# Altium PCB BUCK-BOOST_PWM_Controller.PcbDoc (part 2 of 2)
Units mil, origin at the board's own origin, x right, y up, seen from the top; angles counter-clockwise.
Board outline 3547.43 x 2765.94 mil, 2 copper layers (Top Layer, Bottom Layer); 199 components, 100 nets, 475 pads, 71 vias.
Unrouted connection lines stored in the file: 456.
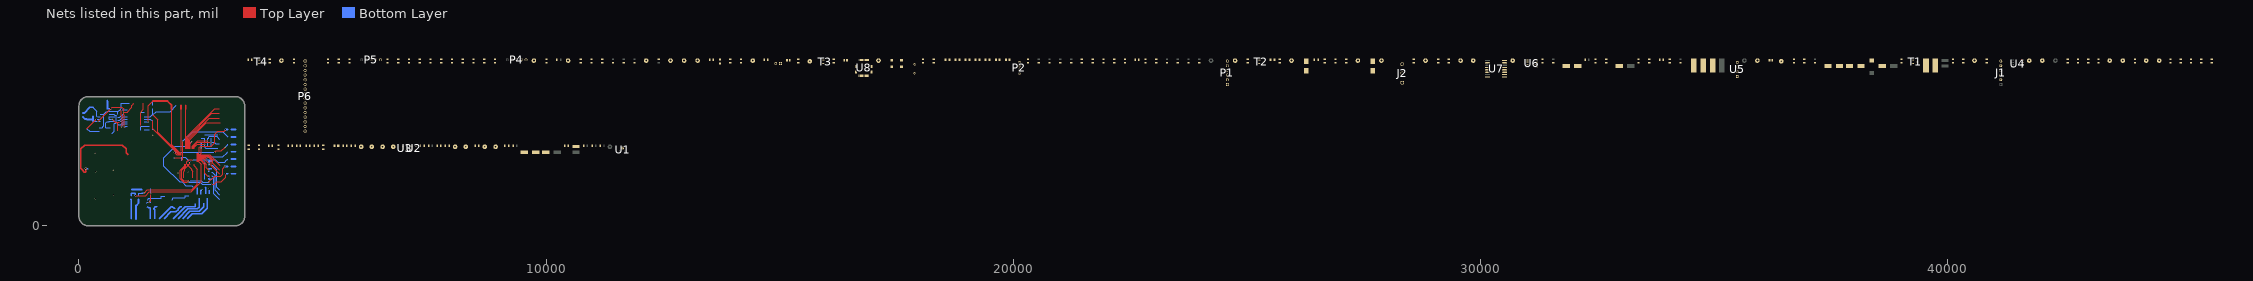
[diagram p2: the nets of this part, all layers, seen from the top]

## Via types
v1: diameter 31.5, hole 15.75, Top Layer to Bottom Layer, tented both sides, 63 vias
v2: diameter 50, hole 28, Top Layer to Bottom Layer, 8 vias

## Nets (pads, with @x,y where several pads share a name; then routed paths per layer and width w, separated by ;. In a path a pad name is that pad's centre, name@x,y a point inside that pad or via, vN(x,y) a via of type N, cw(c..) or ccw(c..) an arc to the next point about the centre after c; other vN are vias at no path point) (continued)
+5V_ISO: C27.1 R20.2 R22.2 R23.2 TP18.1 U5.4 U6.8 U7.10 U7.16 | length 1902.1
  Top Layer w19.68: v1(901.57,2124.02) 932.09,2154.53 932.09,2342.52 908.46,2366.14 908.46,2483.27 v1(909.45,2484.25)
  Bottom Layer w19.68: 430.13,2103.35 500.98,2103.35 506.89,2109.26 506.89,2120.08 529.53,2142.72 529.53,2387.8 ; 454.13,2383.07 524.8,2383.07 529.53,2387.8 ; 609.25,2438.98 580.71,2438.98 529.53,2387.8 ; 609.25,2446.85 836.61,2446.85 844.49,2446.85 ; 836.61,2385.82 836.61,2438.98 844.49,2446.85 ; v1@903.83,2121.76 v1(901.57,2124.02) 902.47,2124.02 960.54,2182.09 1037.4,2182.09 ; 1037.4,2482.09 911.61,2482.09 v1(909.45,2484.25) ; 1077.36,2618.11 909.45,2618.11 v1(909.45,2484.25) ; 844.49,2446.85 879.92,2482.28 907.48,2482.28 v1(909.45,2484.25)
+5V_OUT: C31.2 C33.1 L5.2 P2.1 R2.2 R25.2 R36.2 R68.2 U5.2
+5VDC: C20.2 C23.1 C28.2 C30.2 L2.1 L4.1 L5.1 P6.1 TP16.1 | length 310.4
  Bottom Layer w31.5: 1604.33,374.01 1604.33,365.15 1621.06,348.42 1621.06,156.33 1628.06,149.34 ; 1607.44,382.87 1636.69,412.12 1665.23,412.12 1669.45,416.34
GND_2: C27.2 J2.2 R29.1 R32.1 TP27.1 U5.3 U6.5 U7.9 U7.15 ZD1.1 ZD2.1 | length 2511.6
  Top Layer w19.68: v1(409.45,2233.07) 710.83,2534.45 922.24,2534.45 954.72,2501.97 v1(954.72,2433.07) ; v1(968.5,2109.25) 968.66,2109.41 968.66,2368.6 954.72,2382.53 v1(954.72,2433.07) ; 1151.34,2592.09 1177.36,2618.11 ; 1151.34,2595.55 1135.83,2580.03 1135.83,2538.39 1032.77,2435.33 956.98,2435.33 v1(954.72,2433.07)
  Bottom Layer w19.68: 77.76,2328.74 86.62,2328.74 ; 160.34,2287.51 171.26,2276.58 ; 300.2,2238.19 305.31,2233.07 v1(409.45,2233.07) 454.13,2233.07 ; 836.61,2318.9 874.01,2318.9 954.72,2399.62 v1(954.72,2433.07) 955.22,2432.58 1036.91,2432.58 1037.4,2432.09 ; v1(968.5,2109.25) 970.76,2111.51 977.29,2111.51 997.87,2132.09 1037.4,2132.09
  Bottom Layer w39.37: 86.62,2328.74 127.85,2287.51 160.34,2287.51 ; 171.26,2276.58 300.2,2276.58 ; 300.2,2238.19 300.2,2276.58 ; 300.2,2345.24 300.2,2292.32 300.2,2276.58 ; 608.27,2683.07 608.27,2666.34 608.76,2665.85 608.76,2506.4 609.25,2505.91 609.74,2506.4 681.59,2506.4 v1(682.09,2506.89)
GND_III: C1.1 C2.1 C3.2 C4.2 C5.1 C7.1 C9.1 C12.1 C13.1 C14.1 C15.1 C16.1 C17.1 C20.1 C21.2 C22.2 C23.2 C24.2 C25.1 C26.1 C28.1 C29.1 C30.1 C31.1 C32.2 C33.2 C34.1 C35.1 C36.1 C37.1 C38.1 C39.2 C40.2 C41.1 C42.1 C43.1 C44.1 C45.1 C46.1 C47.1 C48.1 C49.1 D1.2 D2.2 D3.2 D4.2 D5.2 D6.2 D7.2 D8.2 D9.2 J1.6 P1.1 P2.4 P3.2 P4.5 P5.5 P6.10 R12.2 R13.2 R14.1 R15.1 R19.1 R31.1 R34.1 R50.1 R51.1 R63.1 R64.1 R65.1 R66.1 R67.1 R71.1 T1.2 T2.2 T3.2 T4.2 TP30.1 TP39.1 U2.2 U3.2 U4.4 U5.1 U7.2 U7.8 U8.8 U8.23 U8.35 U8.47 VD1.1 VD2.1 | length 3990.8
  Top Layer w10: v1(1319.88,2133.86) v1@1320.23,2134.21
  Top Layer w11.81: 2386.81,1319.88 2386.91,1319.98
  Top Layer w19.68: v1@1320.23,2134.21 1319.88,2134.56 v1(1319.88,2434.06) 1377.36,2491.54 1377.36,2618.11 ; v1(1501.14,502.95) 1538.54,540.35 v1(1538.54,682.09)
  Bottom Layer w10: v1(1319.88,2133.86) v1@1320.77,2132.97 ; 1399.61,2430.12 1401.57,2432.09 ; 1400.69,2132.97 1401.57,2132.09 ; 1501.77,2132.09 1501.97,2131.88
  Bottom Layer w19.68: 1316.93,2060.04 1318.41,2061.52 1318.41,2132.38 v1(1319.88,2133.86) ; v1(1319.88,2434.06) 1320.87,2433.07 1396.65,2433.07 1399.61,2430.12 ; v1@1320.77,2132.97 1400.69,2132.97 ; 1401.57,2132.09 1501.77,2132.09 ; 1451.78,488.19 1466.54,502.95 v1(1501.14,502.95) 1523.77,502.95 1529.68,497.05 ; 1464.73,558.07 1473.58,558.07 1479.49,563.98 1479.49,583.94 1491.02,595.47 1757.04,595.47 1766.89,605.32 1766.89,635.83 1767.88,636.81 1839.71,636.81 ; 1529.68,494.09 1529.68,497.05 ; 1538.54,561.02 1532.63,555.12 1529.68,555.12 1529.68,497.05 ; v1(1538.54,682.09) 1538.54,718.5 ; 1539.52,718.5 1539.52,788.38 ; 1989.33,558.07 1997.62,558.07 2003.53,563.98 2003.53,586.62 2015.06,598.15 2151.57,598.15 2261.39,598.15 2272.92,609.68 2272.92,634.84 2278.83,640.75 2284.59,640.75 ; 2292.48,640.75 2353.51,640.75 2354.49,639.76 ; 2690.94,1950.79 2693.01,1952.85 2973.33,1952.85 ; 2696.85,1363.18 2707.68,1374.01 ; 2698.08,999.01 2698.08,1370.08 ; 3003.84,1951.87 3005.91,1953.94
  Bottom Layer w31.5: 1459.65,409.45 1464.73,409.45 1491.31,382.87 1525.59,382.87 1525.59,374.01 ; 1521.65,154.33 1521.65,358.11 1522.87,359.33 1522.87,366.79 ; 1721.65,154.33 1978.74,411.42 ; 1978.74,410.43 2001.36,410.43 2040.73,371.06 2048.38,371.06 2048.38,363.41 ; 2609.25,680.12 2609.25,756.89 v1(2644.68,756.89) ; 2788.39,682.09 2788.39,749.02 2790.35,750.99 2790.35,757.88
  Bottom Layer w39.37: 1138.77,774.61 1139.27,775.1 1343.98,775.1 1344.48,775.59
  other v1: 351.38,580.71 740.16,665.35 2791.34,805.12 2121.06,1138.78 2340.55,1145.67 359.1,1158.46 732.28,1193.9 353.35,1557.09 1581.69,1940.94
NetC3_1: C3.1 C7.2 L1.1 U1.2 | length 1874.7
  Top Layer w31.5: 138.93,1147.64 119.09,1147.64 93.5,1173.23 93.5,1178.15 41.34,1230.31 41.34,1647.64 122.05,1728.35 929.13,1728.35 1008.86,1648.62 1008.86,1560.04 1052.17,1516.73 ; v2(147.49,1225.39) 147.49,1158.62 156.5,1149.61
  Bottom Layer w31.5: v2(147.49,1225.39) 151.03,1221.85 189.96,1221.85 192.91,1218.9 192.91,1207.68
NetC6_1: C6.1 C18.1 R9.2 R16.1 TP11.1 U2.4
NetC6_2: C6.2 C16.2 R3.2 R14.2 TP3.1 U2.3
NetC8_1: C8.1 C19.1 R10.2 R17.1 TP13.1 U3.4
NetC8_2: C8.2 C17.2 R4.2 R15.2 TP5.1 U3.3
NetC10_1: C10.1 P6.8 R9.1 TP10.1
NetC10_2: C10.2 P6.9 R3.1 TP2.1
NetC11_1: C11.1 P6.6 R10.1 TP12.1
NetC11_2: C11.2 P6.7 R4.1 TP4.1
NetC12_2: C12.2 R5.1 R6.2
NetC13_2: C13.2 R6.1 R12.1 TP6.1 U8.10
NetC14_2: C14.2 R7.1 R8.2
NetC15_2: C15.2 R8.1 R13.1 TP8.1 U8.11
NetC18_2: C18.2 R5.2 R16.2 TP7.1 U2.1
NetC19_2: C19.2 R7.2 R17.2 TP9.1 U3.1
NetC24_1: C24.1 C26.2 L2.2 TP14.1 U4.8 | length 492.8
  Bottom Layer w31.5: 1821.65,154.33 1964.57,297.24 2075.79,297.24 2127.12,348.58 2127.12,362.2 2127.12,371.06 2135.98,371.06 2173.39,408.46 2196.03,408.46
NetC39_1: C39.1 U8.5 Y1.2 | length 325.7
  Top Layer w11.81: 2242.52,1029.53 2242.52,1159.93 2255.73,1173.14 2255.73,1179.13 2268.68,1192.08 2268.68,1204.97 ; 2268.7,1204.99 2268.7,1221.46 2327.76,1280.51 2327.76,1319.88
NetC40_1: C40.1 U8.6 Y1.1 | length 326.5
  Top Layer w11.81: 2347.44,1319.88 2347.54,1319.79 2347.54,1279.43 2412.4,1214.57 2412.4,1192.91 2434.65,1170.67 2434.65,1029.53
NetC41_2: C41.2 R35.1 U8.7 | length 326.4
  Top Layer w11.81: 2367.13,1319.88 v1(2367.13,1373.03)
  Bottom Layer w19.68: 2203.73,1390.75 2203.73,1463.59 ; 2206.69,1469.49 2270.67,1469.49 v1(2367.13,1373.03)
NetC42_2: C42.2 R60.2 R63.2 TP37.1 U8.13 | length 2210.2
  Top Layer w11.81: v1(1207.68,646.65) 1429.13,646.65 1508.86,726.38 2406.5,726.38 2620.08,939.96 2620.08,1316.93 2558.07,1378.94 2524.61,1378.94
  Bottom Layer w31.5: v1(1207.68,646.65) 1207.68,695.85
  Bottom Layer w39.37: 1120.09,645.67 1120.09,693.91 ; 1122.04,695.87 1202.74,695.87
NetC43_2: C43.2 R52.2 R64.2 TP33.1 U8.12 | length 1851.6
  Top Layer w11.81: v1(1393.7,695.87) 1466.54,768.7 2416.34,768.7 2537.4,889.76 2537.4,1213.5 2465.55,1285.35 2465.55,1319.88
  Bottom Layer w19.68: 1275.59,647.64 1275.59,696.84 1344.48,696.85
  Bottom Layer w31.5: 1344.48,696.85 1392.72,696.85 v1(1393.7,695.87)
NetC44_2: C44.2 R62.2 R67.2 TP36.1 U8.16 | length 440.4
  Top Layer w11.81: 2524.61,1437.99 2677.17,1437.99 v1(2784.45,1330.71)
  Bottom Layer w31.5: 2779.77,1304.13 2784.45,1308.81 2784.45,1345.62 2780.51,1349.56 2780.51,1375 2784.45,1378.94 2840.56,1378.94
NetC45_2: C45.2 R58.2 R65.2 TP35.1 U8.15 | length 526.5
  Top Layer w11.81: 2524.61,1418.31 2622.05,1418.31 2724.41,1315.95 2724.41,1244.09 v1(2781.5,1187.01)
  Bottom Layer w31.5: 2777.8,1152.56 2778.3,1153.05 2778.3,1221.95 2778.79,1222.44 2782.73,1226.38 2838.59,1226.38
NetC46_2: C46.2 R53.2 R66.2 TP31.1 U8.14 | length 648.5
  Top Layer w11.81: 2524.61,1398.62 2606.3,1398.62 2693.9,1311.02 2693.9,1121.06 v1(2778.54,1036.42)
  Bottom Layer w31.5: 2777.8,1068.89 2777.31,1068.4 2777.31,999.5 2776.82,999.01 2779.77,996.06 2838.58,996.06
NetC47_2: C47.2 P4.4 R55.1 U8.27 | length 910.9
  Top Layer w11.81: 2426.18,1654.53 2426.18,1706.69 2539.37,1819.88 v1(2761.81,1819.88)
  Bottom Layer w19.68: 2758.85,1694.88 2760.33,1696.36 2760.33,1818.4 v1(2761.81,1819.88) 2761.81,1869.09 2762.79,1870.08 ; 2761.8,1871.06 2768.83,1871.06 2774.74,1876.97 2774.74,1900.87 2786.27,1912.4 2947.44,1912.4 3005.91,1853.94
NetC48_2: C48.2 P4.3 R56.1 U8.26 | length 827.3
  Top Layer w11.81: 2445.87,1654.53 2445.87,1694.88 2534.45,1783.46 v1(2829.72,1783.46)
  Bottom Layer w19.68: 2827.75,1694.88 2828.74,1695.87 2828.74,1782.48 v1(2829.72,1783.46) ; 2829.72,1872.04 v1(2829.72,1783.46) ; 3005.91,1753.94 2931.1,1753.94 2901.57,1783.46 v1(2829.72,1783.46)
NetC49_2: C49.2 P4.2 R57.1 R59.1 U8.25 | length 844.9
  Top Layer w11.81: 2465.55,1654.53 2465.65,1654.62 2465.65,1685.13 2530.51,1750 v1(2689.96,1750)
  Bottom Layer w19.68: 2619.1,1871.06 2619.59,1871.56 2690.45,1871.56 2690.94,1872.05 ; 2689.95,1694.88 2698.36,1694.88 2704.27,1688.98 2704.27,1666.45 2715.8,1654.92 2975.39,1654.92 ; 2689.96,1871.07 2690.45,1870.58 2690.45,1750.49 v1(2689.96,1750) 2689.96,1700.79 2694.88,1700.79
NetD1_1: D1.1 R1.1
NetD2_1: D2.1 R30.1 | length 101.8
  Bottom Layer w11.81: 1500.01,2060.04 1500.98,2061.02
  Bottom Layer w19.68: 1399.61,2060.04 1500.01,2060.04
NetD3_1: D3.1 R40.1 | length 96.5
  Bottom Layer w39.37: 3260.83,1586.61 3357.28,1586.61
NetD4_1: D4.1 R41.1 | length 96.5
  Bottom Layer w39.37: 3260.83,1744.09 3357.28,1744.09
NetD5_1: D5.1 R37.1 | length 96.5
  Bottom Layer w39.37: 3260.83,1114.17 3357.28,1114.17
NetD6_1: D6.1 R38.1 | length 96.5
  Bottom Layer w39.37: 3260.83,1271.65 3357.28,1271.65
NetD7_1: D7.1 R39.1 | length 96.5
  Bottom Layer w39.37: 3260.83,1429.13 3357.28,1429.13
NetD8_1: D8.1 R42.1 | length 96.5
  Bottom Layer w39.37: 3260.83,1901.57 3357.28,1901.57
NetD9_1: D9.1 R43.1 | length 96.5
  Bottom Layer w39.37: 3260.83,2059.06 3357.28,2059.06
NetD10_1: D10.1 R61.1
NetD10_2: D10.2 P3.1 R54.2 TP34.1 U8.28
NetJ1_2: J1.2 U8.34 | length 925.8
  Top Layer w11.81: 2286.81,2494.69 2286.81,1677.25 2288.29,1675.77 2288.29,1654.62 2288.39,1654.53
  Top Layer w39.37: 2286.81,2494.69 2286.81,2579.72
NetJ1_3: J1.3 U8.37 | length 987.3
  Top Layer w11.81: 2186.81,2495.87 2186.81,1595.57 2186.91,1595.47 2189.96,1595.47
  Top Layer w39.37: 2186.81,2495.87 2186.81,2579.72
NetJ1_4: J1.4 R24.1 TP22.1 U7.4 U8.39 | length 2021.4
  Top Layer w11.81: 1582.68,2374.02 1684.06,2272.64 1684.06,2006.89 2134.84,1556.1 2189.96,1556.1
  Bottom Layer w19.68: 1401.57,2332.09 1531.78,2332.09 1573.7,2374.02 1582.68,2374.02 ; 1582.68,2505.9 1582.68,2374.02 ; 2086.81,2579.72 1950,2442.91 1651.57,2442.91 1582.68,2374.02
NetJ1_5: J1.5 R21.1 TP24.1 U7.6 U8.38 | length 2287.9
  Top Layer w11.81: 1985.24,2579.72 1985.24,1740.16 2149.61,1575.79 2189.96,1575.79
  Top Layer w19.68: v1(1482.28,2232.28) 1482.28,2567.91 1585.63,2671.26
  Top Layer w39.37: 1585.63,2671.26 1895.28,2671.26 1986.81,2579.72 ; 1985.25,2497.05 1985.25,2576.15
  Bottom Layer w15.75: 1401.57,2232.09 1401.67,2232.19 1482.19,2232.19 v1(1482.28,2232.28) ; 1584.65,2577.75 1585.14,2578.24 ; 1585.14,2670.77 1585.63,2671.26
  Bottom Layer w19.68: 1400.98,2232.68 1401.57,2232.09 ; 1585.14,2578.24 1585.14,2670.77
NetJ2_1: J2.1 R32.2 U6.7 ZD2.2 | length 575.9
  Bottom Layer w19.68: 77.76,2407.48 83.67,2413.39 ; 299.93,2537.13 300.2,2537.4 385.83,2451.77 385.83,2347.44 399.61,2333.66 453.54,2333.66 454.13,2333.07
  Bottom Layer w39.37: 83.67,2413.39 111.21,2413.39 234.96,2537.13 299.93,2537.13
NetJ2_3: J2.3 R20.1 U6.6 ZD1.2 | length 650.6
  Top Layer w19.68: 171.26,2079.73 172.25,2079.73 374.01,2281.5 v1(375,2281.5)
  Bottom Layer w19.68: 171.26,2079.73 228.59,2022.4 299.21,2022.4 301.42,2024.61 430.12,2024.61 ; v1(375,2281.5) 375.98,2282.48 453.54,2282.48 454.13,2283.07
NetP1_2: P1.2 U8.31 | length 1052.5
  Top Layer w11.81: 2347.44,1654.53 2347.44,1868.11 2785.43,2306.1 3004.92,2306.1
NetP1_3: P1.3 U8.33 | length 1197.8
  Top Layer w11.81: 2308.07,1654.53 2308.07,1907.48 2906.53,2505.93 3004.75,2505.93 3004.92,2506.1
NetP1_4: P1.4 U8.19 | length 645.2
  Top Layer w11.81: 2524.61,1497.05 2781.5,1497.05 2869.09,1409.45 2869.09,1342.52 3008.73,1202.88
NetP1_5: P1.5 U8.20 | length 585.6
  Top Layer w11.81: 2524.61,1516.73 2797.24,1516.73 3018.51,1295.47
NetP1_6: P1.6 U8.42
NetP2_2: P2.2 R47.2
NetP2_3: P2.3 R48.2
NetP5_2: P5.2 R53.1 | length 581.5
  Bottom Layer w19.68: 2838.58,1074.8 2847.43,1074.8 2884.84,1037.39 2884.84,690.54 3007.07,568.31
NetP5_3: P5.3 R58.1 | length 555.5
  Bottom Layer w19.68: 2838.59,1147.64 2844.49,1141.73 2855.32,1141.73 2918.31,1078.74 2918.31,757.07 3007.07,668.31
NetP5_4: P5.4 R62.1 | length 615.1
  Bottom Layer w19.68: 2833.93,1294.29 2839.84,1300.2 2840.56,1300.2 2849.42,1300.2 2948.82,1200.79 2948.82,826.56 3007.07,768.31
NetP6_2: P6.2 R60.1 | length 417.1
  Bottom Layer w39.37: 1113.17,560.01 1120.09,566.93 ; 1121.65,154.33 1121.65,561.64
NetP6_3: P6.3 R52.1 | length 448
  Bottom Layer w39.37: 1223.43,142.51 1223.43,434.06 1275.6,486.23 1275.6,568.9
NetP6_4: P6.4 R68.1 R69.2
NetP6_5: P6.5 R69.1 T4.3
NetP6_11: P6.11 R25.1 R28.2 | length 644.8
  Bottom Layer w31.5: 2021.65,154.33 2273.83,406.5 2492.13,406.5 2492.13,424.22 2492.13,476.38
NetP6_12: P6.12 R28.1 T2.3 | length 738.6
  Bottom Layer w31.5: 2121.65,154.33 2327.56,360.24 2530.51,360.24 2571.85,401.57 2571.85,587.6
NetP6_13: P6.13 R2.1 R11.2 | length 625.2
  Bottom Layer w31.5: 2221.65,154.33 2377.36,310.04 2572.83,310.04 2672.24,409.46 2672.24,418.31 2672.24,478.34
NetP6_14: P6.14 R11.1 T1.3 | length 731.8
  Bottom Layer w31.5: 2321.65,154.33 2427.17,259.84 2629.92,259.84 2750.98,380.91 2750.98,418.31 2750.98,589.57
NetP6_15: P6.15 R36.1 R46.2
NetP6_16: P6.16 R46.1 T3.3
NetR18_1: R18.1 U8.32 | length 1124.9
  Top Layer w11.81: 2327.76,1654.53 2327.76,1887.8 2845.47,2405.51 3004.92,2405.51
NetR18_2: R18.2 R19.2 T1.1 TP17.1 | length 150.5
  Bottom Layer w31.5: 2707.68,830.7 2707.68,821.84 2709.42,819.44 2710.63,812.01 2710.63,748.04 2713.58,745.09 2713.58,712.6 2713.58,682.09
NetR22_1: R22.1 R26.1 TP20.1 U6.4 | length 399.2
  Bottom Layer w19.68: 675.2,2104.33 674.71,2103.84 580.21,2103.84 579.72,2103.35 579.72,2200.79 611.42,2232.48 647.64,2232.48 648.23,2233.07 740.44,2233.07 740.63,2233.26 751.97,2233.26 757.87,2239.17 757.87,2250.98
NetR23_1: R23.1 R27.1 TP25.1 U6.1 | length 602.3
  Bottom Layer w15.75: 710.63,1973.43 710.63,1981.94 ; 757.87,2177.16 757.87,2185.34 765.75,2193.22 789,2193.22 798.23,2202.44 798.23,2360.54 789,2369.76 765.75,2369.76 757.87,2377.64 757.87,2385.82
  Bottom Layer w19.68: 648.23,2383.07 757.87,2383.07 ; 710.63,1981.94 757.87,2029.18 757.87,2177.16
NetR26_2: R26.2 U7.13 | length 232.3
  Bottom Layer w19.68: 836.61,2255.91 842.52,2261.81 876.97,2261.81 947.24,2332.09 1037.4,2332.09
NetR27_2: R27.2 U7.11 | length 233.4
  Bottom Layer w19.68: 836.61,2177.16 836.61,2173.66 842.52,2167.75 898.06,2167.75 962.4,2232.09 1037.4,2232.09
NetR29_2: R29.2 TP23.1 U6.2 U6.3 U7.12 | length 795.5
  Top Layer w19.68: v1(709.04,2284.05) 780.5,2212.59 835.63,2212.59 ; 835.63,2035.43 835.63,2212.59 ; v1(885.65,2212.59) 835.63,2212.59
  Bottom Layer w19.68: v1(709.04,2284.05) 708.55,2283.56 648.72,2283.56 648.23,2283.07 648.23,2333.07 751.97,2333.07 757.87,2327.17 757.87,2318.9 ; v1(885.65,2212.59) 955.14,2282.09 1037.4,2282.09
NetR30_2: R30.2 R31.2 TP21.1 U7.5 U8.40 | length 1382.7
  Top Layer w11.81: 1582.68,2246.06 1582.68,2076.77 2123.03,1536.42 2189.96,1536.42
  Bottom Layer w19.68: 1401.57,2282.09 1531.78,2282.09 1567.8,2246.06 1582.68,2246.06 1581.69,2245.08 1581.69,2132.87 1580.71,2131.88 1580.22,2131.39 1580.22,2061.51 1579.72,2061.02
NetR33_1: R33.1 U8.29 | length 1900.3
  Top Layer w11.81: 2386.81,1654.53 2386.81,1762.8 v1(2419.29,1795.28)
  Bottom Layer w19.68: v1(2419.29,1795.28) 2416.34,1795.28 2328.74,1707.68 2065.94,1707.68 1819.88,1461.61 1819.88,1278.54 2154.53,943.9 2207.68,943.9 2290.35,861.22 2414.36,861.22 2437.01,838.58 2445.87,838.58 2451.77,832.67 2451.77,823.81
NetR33_2: R33.2 R34.2 T2.1 TP26.1 | length 136.5
  Bottom Layer w31.5: 2530.51,814.96 2530.51,755.91 2530.51,747.05 2534.45,743.12 2534.45,680.12
NetR37_2: R37.2 U8.2 | length 1556.2
  Top Layer w11.81: 2268.7,1319.88 2268.7,1283.46 2170.28,1185.04 2170.28,1003.94 2244.09,930.12 2333.66,930.12 v1(2334.65,931.1)
  Top Layer w19.68: v1(2842.52,888.78) 2895.42,888.78 2948.57,941.93 3043.31,941.93 3138.78,1037.4 v1(3138.78,1114.17)
  Bottom Layer w11.81: 3181.1,1113.19 3182.09,1114.18
  Bottom Layer w19.68: v1(2334.65,931.1) 2602.36,931.1 2644.68,888.78 v1(2842.52,888.78)
  Bottom Layer w39.37: v1(3138.78,1114.17) 3180.11,1114.17 3181.1,1113.19
NetR38_2: R38.2 U8.3 | length 1570.6
  Top Layer w11.81: 2288.39,1319.88 2288.39,1275.59 2198.82,1186.02 2198.82,1008.86 2240.16,967.52 v1(2366.14,967.52)
  Top Layer w19.68: v1(2783.46,937.99) 2908.46,1062.99 3034.45,1062.99 3078.74,1107.28 3078.74,1225.39 v1(3124.02,1270.67)
  Bottom Layer w11.81: 3181.1,1270.67 3182.09,1271.66
  Bottom Layer w19.68: v1(2366.14,967.52) 2368.11,969.49 2621.43,969.49 2653.91,937.01 2782.48,937.01 v1(2783.46,937.99)
  Bottom Layer w39.37: v1(3124.02,1270.67) 3181.1,1270.67
NetR39_2: R39.2 U8.4 | length 1001.8
  Top Layer w11.81: 2308.07,1319.88 2308.07,1374.02 2350.39,1416.34 2433.07,1416.34 v1(2436.02,1413.39)
  Bottom Layer w19.68: v1(2436.02,1413.39) 2437.99,1415.35 2917.32,1415.35 2969.49,1363.19 3116.14,1363.19 3163.39,1410.44 3172.24,1410.44 3182.09,1420.28 3182.09,1429.14
NetR40_2: R40.2 U8.17 | length 725.1
  Top Layer w11.81: 2524.61,1457.68 2707.68,1457.68 2718.5,1446.85 v1(2747.05,1446.85)
  Bottom Layer w19.68: v1(2747.05,1446.85) 2779.53,1479.33 3083.66,1479.33 3172.24,1567.91 3172.24,1576.78 3182.09,1586.62
NetR41_2: R41.2 U8.41 | length 1382
  Top Layer w11.81: v1(2045.28,1570.87) 2099.41,1516.73 2189.96,1516.73
  Top Layer w19.68: v1(2903.54,1572.83) 2905.99,1572.83 2936.5,1603.35 3051.18,1603.35 3129.92,1682.09 v1(3129.92,1684.06)
  Bottom Layer w11.81: v1@2902.56,1571.85 v1(2903.54,1572.83) ; 3182.09,1735.24 3182.09,1744.1
  Bottom Layer w19.68: v1(2045.28,1570.87) 2046.26,1571.85 v1@2902.56,1571.85 ; v1(3129.92,1684.06) 3130.9,1684.06 3182.09,1735.24
NetR42_2: R42.2 U8.46 | length 1514.4
  Top Layer w11.81: 2189.96,1418.31 2190.06,1418.4 2216.57,1418.4 2225.39,1427.22 v1(2225.39,1808.07)
  Bottom Layer w19.68: v1(2225.39,1808.07) 2432.09,2014.76 3077.76,2014.76 3182.09,1910.44 3182.09,1901.58
NetR43_2: R43.2 U8.22 | length 1029.2
  Top Layer w11.81: 2524.61,1556.1 2524.7,1556.2 2561.12,1556.2 2578.74,1573.82 2578.74,1677.17 2606.3,1704.72 2829.72,1704.72 2905.51,1780.51 2905.51,1954.72 2976.38,2025.59 3106.3,2025.59 v1(3140.75,2060.04)
  Bottom Layer w11.81: 3181.11,2060.04 3182.09,2059.06
  Bottom Layer w39.37: v1(3140.75,2060.04) 3181.11,2060.04
NetR44_1: R44.1 R47.1 U8.43 VD1.2
NetR45_1: R45.1 R48.1 U8.45 VD2.2
NetR49_1: R49.1 U8.30 | length 999.9
  Top Layer w11.81: 2367.13,1654.53 2367.13,1845.47 2727.76,2206.1 3026.68,2206.1
NetR49_2: R49.2 R50.2 T3.1 TP29.1
NetR51_2: R51.2 U8.44 | length 164.9
  Top Layer w11.81: v1(2055.12,1458.66) 2056.2,1457.58 2189.87,1457.58 2189.96,1457.68
  Bottom Layer w11.81: 2025.6,1458.66 v1(2055.12,1458.66)
NetR59_2: R59.2 TP32.1 U8.21 | length 335.2
  Top Layer w11.81: 2524.61,1536.42 2594.49,1536.42 2616.14,1558.07 v1(2616.14,1665.35)
  Bottom Layer w31.5: v1(2616.14,1665.35) 2617.13,1666.34 2617.13,1792.32
NetR70_1: R70.1 U8.18 | length 706.9
  Top Layer w11.81: 2524.61,1477.36 2767.72,1477.36 2830.71,1414.37 2830.71,1288.78 3006.89,1112.6
NetR70_2: R70.2 R71.2 T4.1 TP38.1
NetU4_6: U4.6 U4.7
pads on no net: U1.1 U4.3 U4.5 U7.3 U7.14
copper on no net: | length 14177.7
  Top Layer w11.81: v1(1864.17,1709.65) 1864.17,1574.8 2016.73,1422.24 2073.82,1422.24 2089.47,1437.9 2189.87,1437.9 2189.96,1437.99 ; v1(1904.53,810.04) 1906.5,808.07 2424.21,808.07 2518.7,902.56 2518.7,1207.14 2445.96,1279.88 2445.96,1319.79 2445.87,1319.88 ; v1(1922.24,1635.83) 1921.26,1634.84 1921.26,1562.01 1987.2,1496.06 2056.69,1496.06 2075.39,1477.36 2189.96,1477.36 ; v1(1988.19,1567.91) 1988.19,1564.96 2031.5,1521.65 2062.01,1521.65 2086.61,1497.05 2189.96,1497.05 ; v1(2215.55,860.24) 2217.52,858.27 2441.93,858.27 2499.02,915.35 2499.02,1201.77 2426.18,1274.61 2426.18,1319.88 ; 2406.5,1654.53 2406.5,1722.44 2462.6,1778.54 2462.6,1886.81 v1(2644.68,2068.9)
  Top Layer w19.68: v1(2018.7,487.2) 2021.9,487.2 2050.3,515.61 2052.18,515.61 2066.1,529.53 v1(2066.1,680.12)
  Top Layer w31.5: 163.39,1510.83 129.92,1510.83 107.28,1533.46 107.28,1617.13 129.92,1639.76 612.2,1639.76 643.7,1608.27 643.7,1515.75 ; 181.93,1509.84 205.56,1533.46 v2(205.56,1571.85)
  Bottom Layer w10: 1691.09,632.87 1693.06,634.84
  Bottom Layer w19.68: 1464.65,636.89 1464.73,636.81 1466.69,634.84 1528.7,634.84 1530.66,632.87 ; 1618.26,788.38 1618.26,779.52 1625.15,772.63 1625.15,632.87 1691.09,632.87 ; 1693.06,713.58 1695.03,715.55 1766.89,715.55 1848.57,715.55 1902.27,769.25 1902.27,807.78 v1(1904.53,810.04) ; v1(1988.19,1567.91) 1860.24,1439.96 1860.24,1294.29 2170.28,984.25 2220.47,984.25 2309.06,895.67 2569.6,895.67 2618.82,846.45 2622.05,846.45 2627.95,840.54 2627.95,831.69 ; 1988.34,490.16 1990.31,488.19 2017.72,488.19 v1(2018.7,487.2) 2019.68,488.19 2054.28,488.19 2056.67,490.57 2056.67,560.33 2057.08,560.75 ; 1989.96,636.18 2056.45,636.18 2057.08,635.55 ; v1(2066.1,680.12) 2066.59,680.61 2066.59,718.01 2067.08,718.5 ; 2067.08,785.43 2067.57,784.93 2067.57,716.04 ; 2145.82,718.5 2145.82,638.5 2148.77,635.55 2151.57,635.55 2199.67,635.55 2205.86,641.73 2214.71,641.73 ; 2145.82,785.43 2146.31,784.93 2146.31,718.5 ; 2151.57,560.75 2151.57,488.34 2151.73,488.19 2195.04,488.19 2196.03,487.2 ; v1(2215.55,860.24) 2215.13,859.82 2215.13,720.89 2214.71,720.47 2215.7,719.49 2284.59,719.49 2335.63,719.49 2353.51,719.49 ; 2335.63,718.5 2354.49,718.5 ; v1(2644.68,2068.9) 2642.72,2070.87 2642.72,2339.57 2685.04,2381.89 2693.9,2381.89 2693.9,2492.32 2786.22,2584.65 ; 2776.57,2380.91 2776.57,2446.85
  Bottom Layer w27.56: 1464.65,636.89 1464.65,870.82 ; 1989.96,636.18 1989.96,808.27 1927.4,870.82 1464.81,870.82 1695.87,1101.89 1695.87,2190.94 1877.95,2373.03 2180.12,2373.03 2386.81,2579.72
  Bottom Layer w31.5: v2@205.56,1571.36 238.19,1571.36 238.19,1569.89 238.19,1469.49 259.84,1447.83 283.46,1447.83 283.46,1207.68 ; 852.36,823.82 852.36,821.85 858.27,815.94 860.24,815.94 940.94,735.24 940.94,703.74 949.8,703.74 ; 1664.37,2505.9 1663.88,2506.39 1663.88,2577.26 1663.39,2577.75 1663.39,2586.61 1669.29,2592.51 1678.15,2592.51 1763.79,2678.15 2288.39,2678.15 2386.81,2579.72 ; 1932.09,2078.74 2022.64,2078.74 2102.92,2159.02 2102.92,2201.77 2104.34,2201.77
  Bottom Layer w39.37: v1(1864.17,1709.65) 1864.17,2010.83 1932.09,2078.74 ; v1(1922.24,1635.83) 1854.33,1635.83 1810.04,1680.12 1810.04,2056.69 1932.09,2178.74 1944.87,2178.74 1967.9,2201.77 2025.59,2201.77

## Polygon pours and split planes (outlines as drawn)
GND_III on Top Layer "NONET_L-01_P-001" (solid, pour order 2): 0,0 4.92,4.92 4.92,1796.26 975.39,1796.26 1284.45,2105.32 1284.45,2766.73 3549.21,2766.73 3549.21,0
GND_2 on Top Layer "NONET_L-01_P-001" (solid, pour order 1): 1.51,1880.19 6.43,1875.27 915.88,1875.27 915.88,1878.22 1176.7,2139.05 1176.7,2758.14 79.26,2758.14 1.51,2680.39
GND_III on Bottom Layer "NONET_L-01_P-001" (solid, pour order 3): 0,0 4.92,4.92 4.92,1796.26 975.39,1796.26 1284.45,2105.32 1284.45,2766.73 3549.21,2766.73 3549.21,0
GND_2 on Bottom Layer "NONET_L-01_P-001" (solid, pour order 0): 1.97,1879.92 6.89,1875 916.34,1875 916.34,1877.95 1177.17,2138.78 1177.17,2757.87 79.72,2757.87 1.97,2680.12

## Keep-outs
Keep-Out Layer:
  circle w10: c3346.46,202.76 r67.6
  circle w10: c202.76,202.76 r67.6
  lines w10: 5.91,2564.96 cw(c202.76,2564.96) 202.76,2761.81 3346.46,2761.81 cw(c3346.46,2564.96) 3543.31,2564.96 ; 5.91,2570.87 5.91,202.76 ccw(c202.76,202.76) 202.76,5.91 3346.46,5.91 ccw(c3346.46,202.76) 3543.31,202.76 3543.31,2570.87

## Other copper
Top Layer:
  rectangle net GND_2: 1125.98,2532.48 1176.7,2658.62
Bottom Layer:
  rectangle net GND_2: 1132.87,2542.32 1177.17,2658.62

## Silkscreen, mask and mechanical layers (free items; w line width, h text height)
Top Overlay:
  text "A" at 133.03,2649.76 h39.37
  text "O4" at 2899.76,2493.27 h31.5
  text "CLK" at 2177.32,2449.65 h31.5 r270
  text "RX" at 1981.46,2448.66 h31.5 r270
  text "TX" at 2079.88,2447.68 h31.5 r270
  text "DIO" at 2275.75,2446.69 h31.5 r270
  text "3.3" at 2379.09,2446.69 h31.5 r270
  text "O3" at 2898.78,2390.91 h31.5
  text "INT" at 2797.09,2379.09 h31.5 r90
  text "GND" at 2696.98,2375.61 h31.5 r90
  text "GND" at 1901.42,2367.28 h31.5 r90
  text "O2" at 2896.81,2288.54 h31.5
  text "GND" at 425.81,2280.39 h31.5
  text "3.3" at 2116.47,2268.86 h31.5
  text "O1" at 2897.8,2183.23 h31.5
  text "SDA" at 2086.77,2169.45 h31.5
  text "GND" at 2872.37,2087.2 h31.5
  text "SCL" at 2083.82,2066.1 h31.5
  text "GND" at 2083.29,1965.42 h31.5
  text "GND" at 2876.31,1938.58 h31.5
  text "B" at 154.69,1909.61 h39.37
  text "A" at 2918.46,1839.72 h31.5
  text "B" at 2920.43,1743.27 h31.5
  text "C" at 2919.45,1636.97 h31.5
  text "+5" at 2889,1520.78 h31.5
  text "+5" at 2894.91,1392.83 h31.5
  text "O7" at 2905.67,1296.42 h31.5
  text "O6" at 2895.83,1206.85 h31.5
  text "O5" at 2891.89,1095.63 h31.5
  text "GND" at 2876.31,998.62 h31.5
  text "GND" at 2874.34,854.92 h31.5
  text "C1" at 2910.9,755.78 h31.5
  text "B1" at 2908.62,654.68 h31.5
  text "A1" at 2910.59,553.31 h31.5
  text "+5" at 2887.03,452.87 h31.5
  text "CAT_1" at 2140.72,245.18 h31.5 r90
  text "+5" at 1042.21,242.28 h31.5 r90
  text "I2" at 1139.61,242.28 h31.5 r90
  text "I1" at 1242.95,242.28 h31.5 r90
  text "GND" at 1338.43,242.28 h31.5 r90
  text "+5" at 1437.88,242.28 h31.5 r90
  text "O_N2" at 1533.96,242.28 h31.5 r90
  text "O_P2" at 1631.48,242.28 h31.5 r90
  text "O_N1" at 1727.26,242.28 h31.5 r90
  text "O_P1" at 1843.02,242.28 h31.5 r90
  text "GND" at 1940.79,242.28 h31.5 r90
  text "AN_1" at 2043.2,242.28 h31.5 r90
  text "AN_2" at 2245.96,242.28 h31.5 r90
  text "GND" at 2436.42,242.28 h31.5 r90
  text "GND" at 2541.74,242.28 h31.5 r90
  text "CAT_2" at 2343.48,231.4 h31.5 r90
Bottom Overlay:
  text "CAT_2" at 2333.01,321.85 h27.56 r90
  text "CAT_1" at 2137.14,317.91 h27.56 r90
  text "O_N2" at 1530.84,305.12 h27.56 r90
  text "O_P2" at 1633.2,305.12 h27.56 r90
  text "AN_2" at 2233.6,303.15 h27.56 r90
  text "O_N1" at 1736.55,292.32 h27.56 r90
  text "AN_1" at 2033.79,289.37 h27.56 r90
  text "O_P1" at 1836.94,288.39 h27.56 r90
  text "GND" at 1335.63,281.5 h27.56 r90
  text "GND" at 1938.98,275.59 h27.56 r90
  text "GND" at 2431.1,268.7 h27.56 r90
  text "+5" at 1036.42,254.92 h27.56 r90
  text "I2" at 1135.83,246.06 h27.56 r90
  text "+5" at 1434.06,246.06 h27.56 r90
  text "I1" at 1232.28,242.13 h27.56 r90
  text "GND" at 2504.92,197.83 h27.56 r270

## Text inside footprints (layer, text, board x,y; h text height)
P1: Top Overlay "6" at 24512.06,3510.84 h40 r90; Top Overlay "1" at 24512.06,3021.07 h40 r90
P6: Top Overlay "16" at 4865.43,1912.78 h40 r90